# Altium PCB BetaBake_REV_1.0.PcbDoc (part 5 of 8)
Units mil, origin at the board's own origin, x right, y up, seen from the top; angles counter-clockwise.
Board outline 6000 x 4000 mil, 8 copper layers (USB 2.0 (90 Diff) DDR3 Data (50-100), GND (Top Layer high-speed return paths), DDR3 Fly-by Routing (Address, Command, Control), QSPI Flash (Clk, IO), Int4 PWR, Int5 GND (Shielding between L4 and L6), Int6 eMMC High-Speed Data Lines (8-bit bus), SDIO/peripherals, Int7 GND, Escapes, non-critical tracks, decoupling capacitor vias), stack 60.424 mil thick; 426 components, 331 nets, 1941 pads, 428 vias.
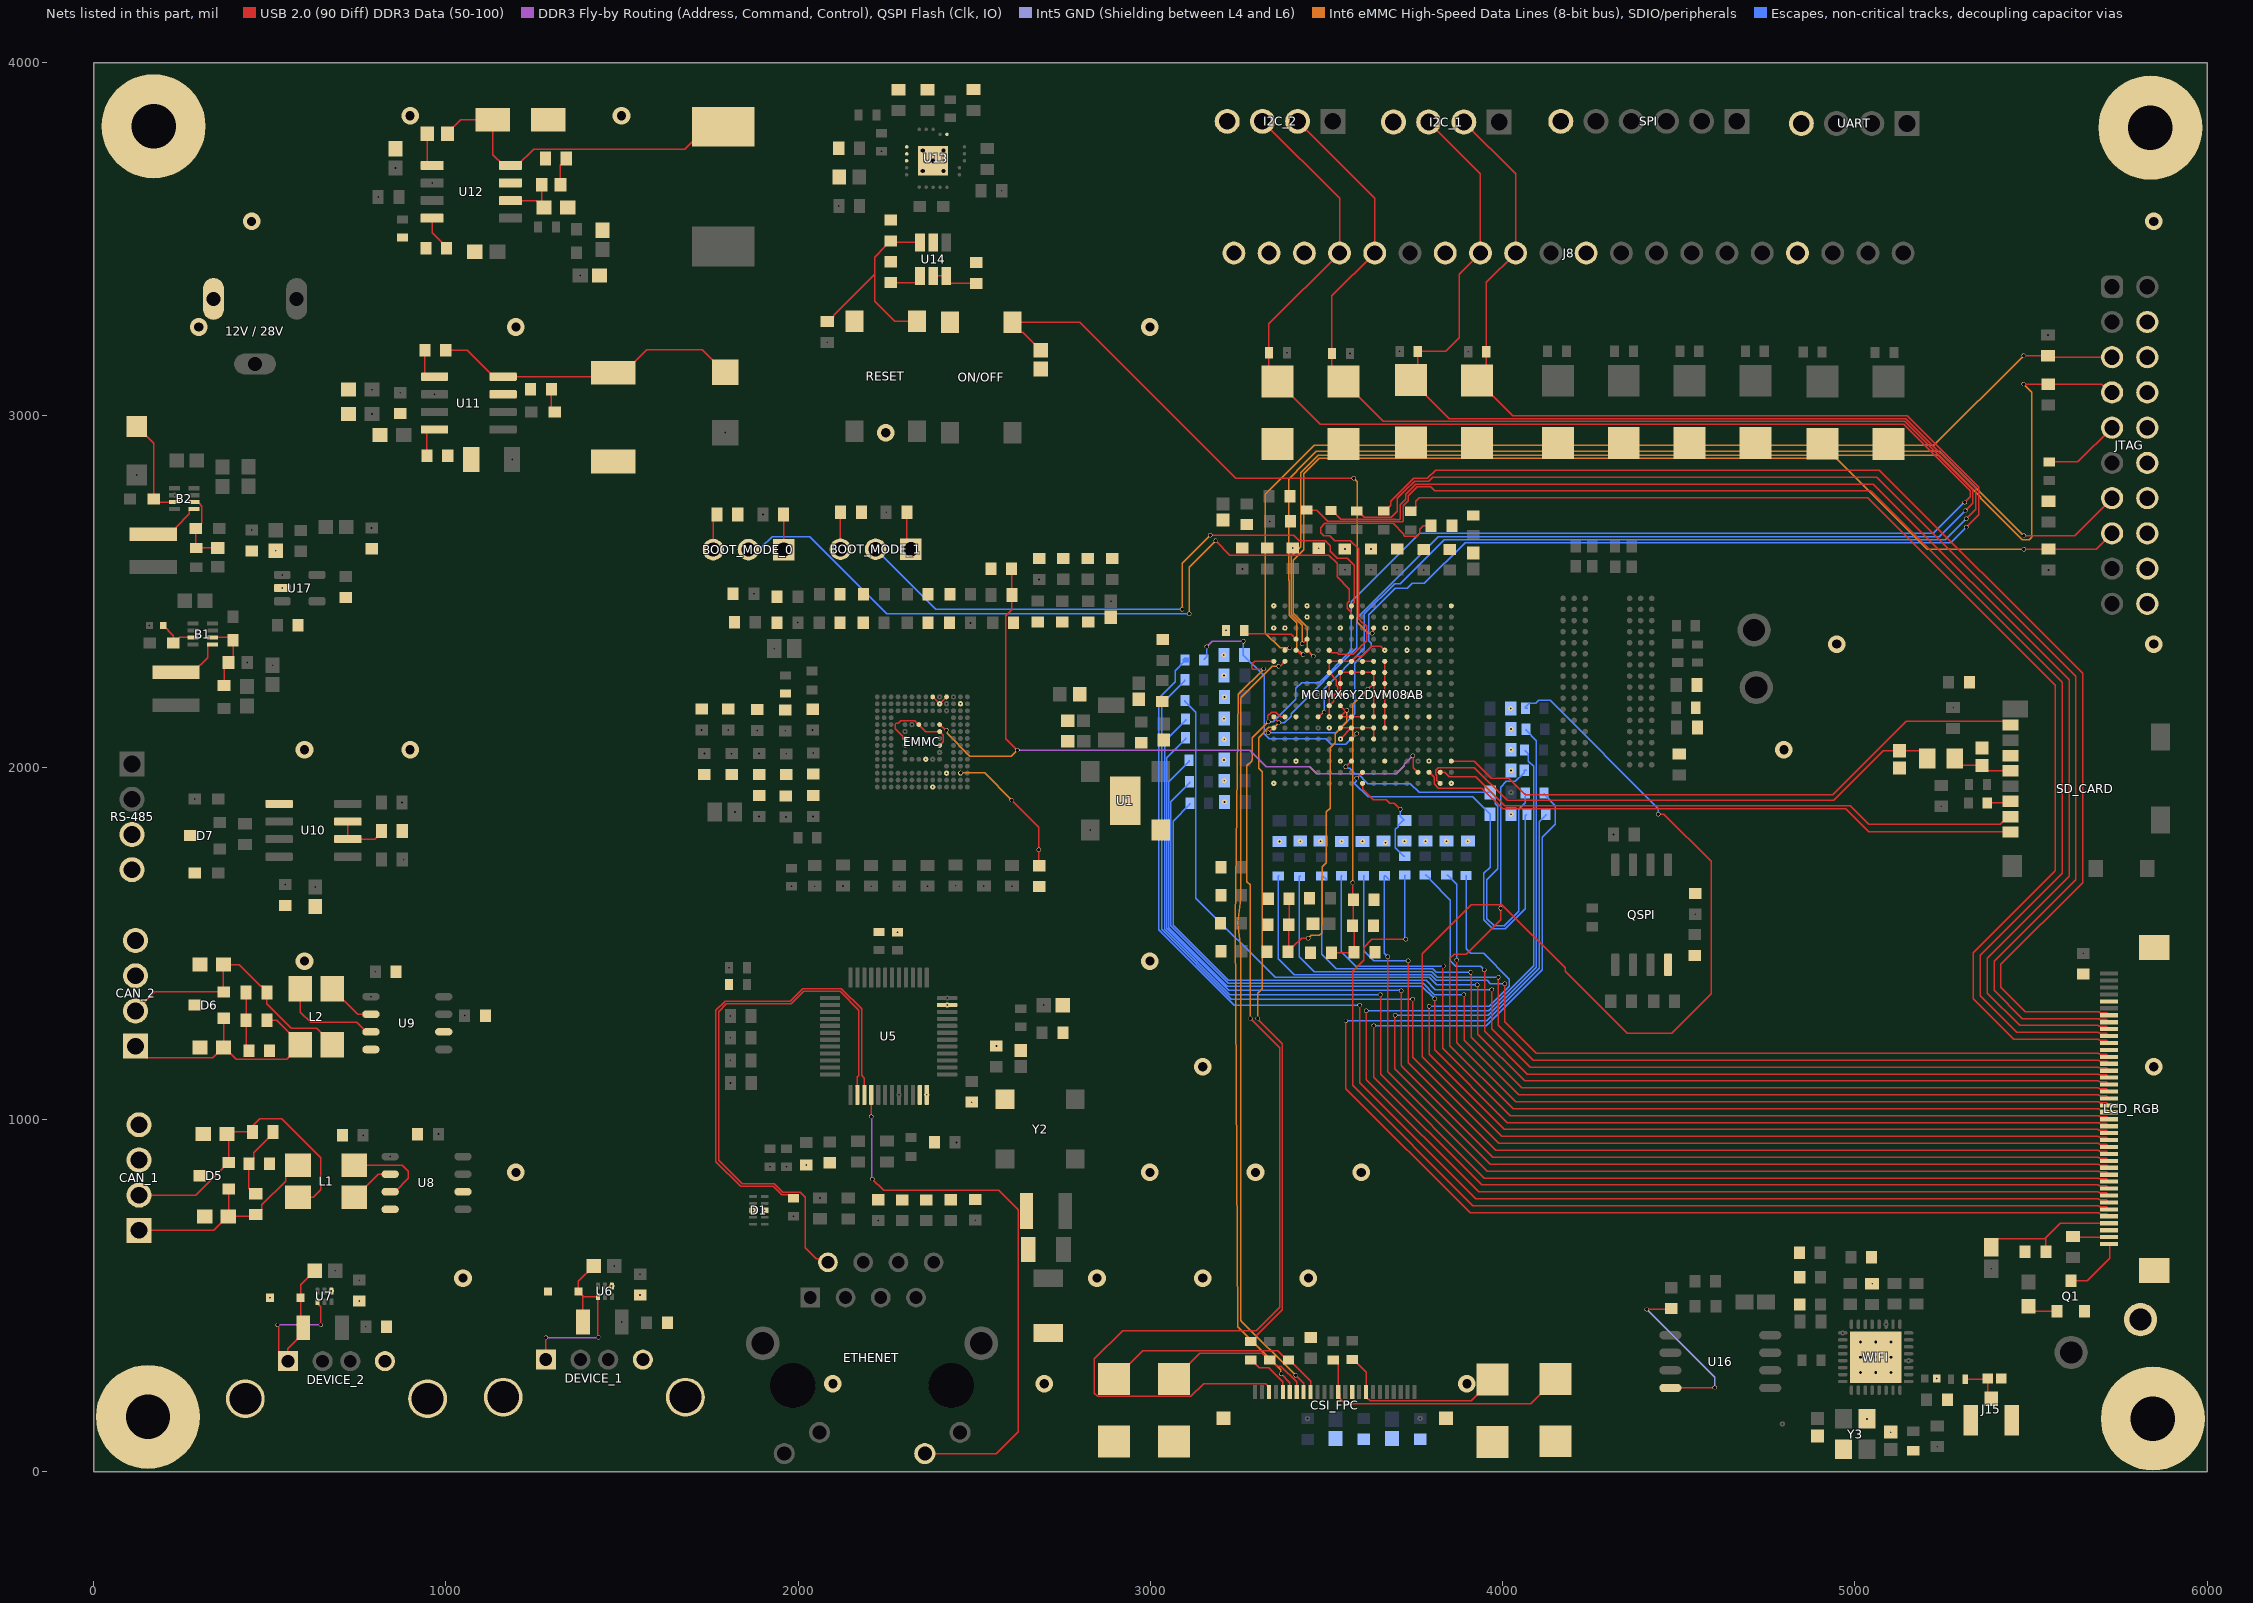
[diagram p10: the nets of this part, all layers, seen from the top]

## Via types
v1: diameter 12, hole 10, USB 2.0 (90 Diff) DDR3 Data (50-100) to Escapes, non-critical tracks, decoupling capacitor vias, 382 vias
v2: diameter 50, hole 26, USB 2.0 (90 Diff) DDR3 Data (50-100) to Escapes, non-critical tracks, decoupling capacitor vias, 28 vias
v3: diameter 19.68, hole 7.87, USB 2.0 (90 Diff) DDR3 Data (50-100) to Escapes, non-critical tracks, decoupling capacitor vias, 9 vias
v4: diameter 23.62, hole 11.81, USB 2.0 (90 Diff) DDR3 Data (50-100) to Escapes, non-critical tracks, decoupling capacitor vias, 5 vias
v5: diameter 7.87, hole 7.87, USB 2.0 (90 Diff) DDR3 Data (50-100) to Escapes, non-critical tracks, decoupling capacitor vias, 4 vias

## Nets (pads, with @x,y where several pads share a name; then routed paths per layer and width w, separated by ;. In a path a pad name is that pad's centre, name@x,y a point inside that pad or via, vN(x,y) a via of type N, cw(c..) or ccw(c..) an arc to the next point about the centre after c; other vN are vias at no path point) (continued)
GND: "12V / 28V.2" C1.2 C2.2 C3.2 C4.2 C5.2 C6.2 C7.2 C8.2 C9.2 C10.2 C11.2 C12.2 C13.2 C14.2 C15.2 C16.2 C17.2 C18.2 C19.2 C20.2 C21.2 C22.2 C23.2 C24.2 C25.2 C26.2 C27.2 C28.2 C29.2 C30.1 C31.1 C32.2 C33.2 C34.2 C35.2 C36.1 C37.2 C38.2 C39.2 C40.2 C41.2 C42.2 C43.2 C44.1 C45.2 C50.1 C51.1 C52.1 C53.2 C54.2 C55.2 C56.2 C57.2 C58.2 C59.2 C60.2 C61.1 C62.1 C63.2 C64.2 C65.2 C66.2 C67.2 C68.2 C69.2 C70.1 C71.1 C72.1 C73.2 C74.2 C75.2 C76.2 C77.2 C78.2 C79.2 C80.1 C81.2 C82.2 C83.2 C87.2 C88.1 C90.1 C91.1 C92.1 C93.1 C94.2 C95.2 C96.2 C97.2 C98.1 C99.1 C100.1 C101.2 C102.1 C103.2 C104.1 C105.2 C106.1 C107.2 C108.1 C109.1 C110.2 C111.1 C112.2 C113.1 C114.1 C115.1 C116.2 C117.1 C120.2 C121.1 C124.1 C128.1 C130.1 C131.1 C134.2 C135.2 C136.2 C139.2 C140.2 C142.2 C144.2 C145.1 C146.2 C147.1 C149.2 C150.1 C152.1 C153.1 C154.1 C155.1 C159.1 C162.1 C163.1 C164.1 C165.1 C166.1 C167.1 C168.1 C169.1 C170.1 C245.2 C356.1 CAN_1.3 CAN_1.4 CAN_2.3 CAN_2.4 CSI_FPC.15 CSI_FPC.MP1 CSI_FPC.MP2 D1.3 D1.8 D2.1 D3.1 D4.1 D5.3 D6.3 D7.3 D8.1 D9.1 D10.1 D11.1 D12.1 D13.1 D14.1 D15.1 D16.1 D17.1 D18.2 D20.2 D22.1 D23.1 D24.1 D25.1 DEVICE_1.4 DEVICE_1.5 DEVICE_1.6 DEVICE_2.4 DEVICE_2.5 DEVICE_2.6 EMMC.A6 EMMC.C4 EMMC.E7 EMMC.G5 EMMC.H10 EMMC.J5 EMMC.K8 EMMC.N2 EMMC.N5 EMMC.P4 EMMC.P6 GND.1 GND_1.1 I2C_1.4 I2C_2.4 J8.4 J8.10 J8.14 J8.18 J8.19 J8.20 J15.G1 J15.G2 JTAG.4 JTAG.6 JTAG.8 JTAG.10 JTAG.12 JTAG.14 JTAG.16 JTAG.18 JTAG.20 LCD_RGB.3 LCD_RGB.29 LCD_RGB.36 LCD_RGB.41 LCD_RGB.42 MCIMX6Y2DVM08AB.A1 MCIMX6Y2DVM08AB.A17 MCIMX6Y2DVM08AB.C3 MCIMX6Y2DVM08AB.C7 MCIMX6Y2DVM08AB.C11 MCIMX6Y2DVM08AB.C15 MCIMX6Y2DVM08AB.E8 MCIMX6Y2DVM08AB.E11 MCIMX6Y2DVM08AB.F6 MCIMX6Y2DVM08AB.F7 MCIMX6Y2DVM08AB.F8 MCIMX6Y2DVM08AB.F9 MCIMX6Y2DVM08AB.F10 MCIMX6Y2DVM08AB.F11 MCIMX6Y2DVM08AB.F12 MCIMX6Y2DVM08AB.G3 MCIMX6Y2DVM08AB.G5 MCIMX6Y2DVM08AB.G7 MCIMX6Y2DVM08AB.G12 MCIMX6Y2DVM08AB.G15 MCIMX6Y2DVM08AB.H7 MCIMX6Y2DVM08AB.H12 MCIMX6Y2DVM08AB.J5 MCIMX6Y2DVM08AB.J7 MCIMX6Y2DVM08AB.J12 MCIMX6Y2DVM08AB.K7 MCIMX6Y2DVM08AB.K12 MCIMX6Y2DVM08AB.L3 MCIMX6Y2DVM08AB.L7 MCIMX6Y2DVM08AB.L12 MCIMX6Y2DVM08AB.M7 MCIMX6Y2DVM08AB.M8 MCIMX6Y2DVM08AB.M9 MCIMX6Y2DVM08AB.M10 MCIMX6Y2DVM08AB.M11 MCIMX6Y2DVM08AB.M12 MCIMX6Y2DVM08AB.N3 MCIMX6Y2DVM08AB.N5 MCIMX6Y2DVM08AB.N7 MCIMX6Y2DVM08AB.R3 MCIMX6Y2DVM08AB.R5 MCIMX6Y2DVM08AB.R7 MCIMX6Y2DVM08AB.R11 MCIMX6Y2DVM08AB.R16 MCIMX6Y2DVM08AB.R17 MCIMX6Y2DVM08AB.T14 MCIMX6Y2DVM08AB.U1 MCIMX6Y2DVM08AB.U14 MCIMX6Y2DVM08AB.U17 ON/OFF.3 pad.329 pad.330 pad.331 pad.332 pad.333 pad.334 pad.335 pad.336 pad.337 pad.338 pad.339 pad.340 pad.341 pad.342 pad.343 pad.347 pad.348 pad.349 pad.351 pad.352 pad.353 pad.354 pad.355 pad.356 pad.358 pad.359 pad.360 pad.361 pad.362 pad.363 pad.364 pad.365 pad.366 pad.367 pad.368 pad.372 pad.373 pad.374 pad.377 pad.378 pad.379 pad.380 pad.381 pad.382 pad.383 pad.384 pad.385 pad.386 pad.387 pad.388 pad.389 pad.390 pad.391 pad.392 pad.393 pad.394 pad.395 pad.396 pad.397 pad.398 pad.399 pad.400 pad.401 pad.402 pad.403 pad.404 pad.405 pad.406 pad.407 pad.408 pad.409 pad.410 pad.411 pad.412 pad.413 pad.414 Q1.2 QSPI.4 R6.1 R7.1 R8.1 R9.1 R10.1 R11.1 R12.1 R13.1 R14.1 R15.1 R16.1 R17.1 R18.1 R19.1 R20.1 R21.1 R22.1 R23.1 R24.1 R25.1 R26.1 R27.1 R28.1 R29.1 R40.2 R43.2 R44.2 R45.1 R46.1 R65.1 R73.1 R76.2 R78.1 R81.1 R86.2 R96.1 R98.2 R135.2 R142.2 R151.2 R152.1 R154.1 R164.1 R165.1 R166.1 R167.1 R169.1 R184.2 R185.2 RESET.3 RS-485.3 RS-485.4 SD_CARD.6 SPI.6 U1.2 U1.5 U5.35 U5.36 U5.47 U6.4 U7.4 U8.2 U8.8 U9.2 U9.8 U10.5 U11.7 U12.7 U13.6 U13.11 U13.12 U13.13 U13.21 U14.2 U16.4 U17.2 UART.4 WIFI.33 Y2.2 Y3.2 Y3.4 | length 1642.4
  USB 2.0 (90 Diff) DDR3 Data (50-100) w4: EMMC.H10@2303.18,2081.96 2275,2110.14 2275,2122.66 2277.34,2125 2283.41,2125 2291.41,2133 2330.88,2133 EMMC.K8@2342.55,2121.33 2362.23,2101.65 EMMC.J5@2401.6,2101.65 2412.49,2090.76 2412.49,2073.17 EMMC.G5@2401.6,2062.28 ; EMMC.P6@2381.92,2200.08 EMMC.N5@2401.6,2180.39 EMMC.P4@2421.29,2200.08 ; MCIMX6Y2DVM08AB.G12@3507.76,2143.5 MCIMX6Y2DVM08AB.H12@3507.76,2174.99 ; MCIMX6Y2DVM08AB.K12@3507.76,2237.98 MCIMX6Y2DVM08AB.J12@3507.76,2206.49 MCIMX6Y2DVM08AB.H12@3507.76,2174.99 ; MCIMX6Y2DVM08AB.F11@3539.25,2112 MCIMX6Y2DVM08AB.F10@3570.75,2112 ; pad.349@3539.83,2080.5 3539.83,2080.79 3570.75,2111.71 MCIMX6Y2DVM08AB.F10@3570.75,2112 ; MCIMX6Y2DVM08AB.E8@3633.74,2080.5 MCIMX6Y2DVM08AB.F8@3633.74,2112 MCIMX6Y2DVM08AB.F9@3602.24,2112 MCIMX6Y2DVM08AB.F10@3570.75,2112 ; MCIMX6Y2DVM08AB.M8@3633.74,2300.98 MCIMX6Y2DVM08AB.M9@3602.24,2300.98 MCIMX6Y2DVM08AB.M10@3570.75,2300.98 ; MCIMX6Y2DVM08AB.F7@3665.24,2112 MCIMX6Y2DVM08AB.G7@3665.24,2143.5 MCIMX6Y2DVM08AB.H7@3665.24,2174.99 MCIMX6Y2DVM08AB.J7@3665.24,2206.49 MCIMX6Y2DVM08AB.K7@3665.24,2237.98 MCIMX6Y2DVM08AB.L7@3665.24,2269.48 MCIMX6Y2DVM08AB.M7@3665.24,2300.98 ; MCIMX6Y2DVM08AB.N7@3665.24,2332.47 3653.95,2343.76 3629.07,2343.76 3615.1,2329.79 3615.1,2329.37 3601.13,2315.4 3585.17,2315.4 MCIMX6Y2DVM08AB.M10@3570.75,2300.98 ; v1(4409,461) 4476.53,461 C167.1@4479,463.47 ; U16.4@4476.27,238 4476.77,238.5 4601.5,238.5 v1(4602,239) ; MCIMX6Y2DVM08AB.H12@3507.76,2174.99 3520.89,2188.12 3520.89,2204.08 3532,2215.19 3532,2228.78 3527.97,2232.82 3527.97,2249.27 MCIMX6Y2DVM08AB.L12@3507.76,2269.48 MCIMX6Y2DVM08AB.M12@3507.76,2300.98 MCIMX6Y2DVM08AB.M11@3539.25,2300.98 MCIMX6Y2DVM08AB.M10@3570.75,2300.98
  Int5 GND (Shielding between L4 and L6) w4: v1(4409,461) 4602,268 v1(4602,239)
  other v2: 2098.43,250 2698.43,250 3898.43,250 1048.43,550 2848.43,550 3148.43,550 3448.43,550 1198.43,850 2998.43,850 3298.43,850 3598.43,850 3148.43,1150 5848.43,1150 598.43,1450 2998.43,1450 598.43,2050 898.43,2050 4798.43,2050 4948.43,2350 5848.43,2350 2248.43,2950 298.43,3250 1198.43,3250 2998.43,3250 448.43,3550 5848.43,3550 898.43,3850 1498.43,3850
  other v3: 5015.69,282 5059,282 5102.31,282 5015.69,325.31 5059,325.31 5102.31,325.31 5015.69,368.61 5059,368.61 5102.31,368.61
  other v4: 2353.55,3692.59 2412.61,3692.59 2383.08,3722.12 2353.55,3751.65 2412.61,3751.65
I2C1_SCL: D13.2 I2C_1.2 J8.12 MCIMX6Y2DVM08AB.F17 R2.1 | length 4909
  USB 2.0 (90 Diff) DDR3 Data (50-100) w4: v1(3334.51,2098) 3335.39,2098 3349.39,2112 MCIMX6Y2DVM08AB.F17@3350.28,2112 ; I2C_1.2@3889.9,3832.06 4037,3684.95 J8.12@4037,3460 3953.59,3376.59 R2.1@3953.59,3180 3953.59,3124.62 D13.2@3927.47,3098.5 4027.98,2998 5148.39,2998 5351,2795.39 5351,2717 v1(5316,2682)
  Escapes, non-critical tracks, decoupling capacitor vias w4: v1(3334.51,2098) 3526.2,2098 3580,2151.8 3580,2296 3627,2343 3627,2352.14 3620,2359.14 3620,2433.14 3694.71,2507.85 3729.71,2507.85 3743.85,2522 3777.85,2522 3893.34,2637.49 5271.49,2637.49 v1(5316,2682)
I2C1_SDA: D12.2 I2C_1.3 J8.13 MCIMX6Y2DVM08AB.G13 R1.1 | length 4919
  USB 2.0 (90 Diff) DDR3 Data (50-100) w4: MCIMX6Y2DVM08AB.G13@3476.26,2143.5 3477.88,2143.5 3491.38,2157 v1(3493,2157) ; I2C_1.3@3789.9,3832.06 3937,3684.95 J8.13@3937,3460 3877,3400 3877,3220 3838,3181 R1.1@3758.59,3181 3758.59,3118.61 D12.2@3739.48,3099.5 3848.98,2990 5145.08,2990 5343,2792.08 5343,2733 v1(5316,2706)
  Escapes, non-critical tracks, decoupling capacitor vias w4: v1(3493,2157) 3493,2223.5 3607,2337.5 3607,2435.41 3693.04,2521.45 3709.7,2521.45 3834.23,2645.99 5255.99,2645.99 v1(5316,2706)
I2C2_SCL: D9.2 I2C_2.2 J8.16 MCIMX6Y2DVM08AB.G17 R3.1 R174.2 | length 7017.6
  USB 2.0 (90 Diff) DDR3 Data (50-100) w4: R174.2@3285,370.28 3288.02,370.28 3298.99,381.25 3298.99,384.27 3374.54,459.82 3374.54,1216 3305,1285.54 v1(3305,1287) ; MCIMX6Y2DVM08AB.G17@3350.28,2143.5 3350.28,2141.28 3350,2141 3351.89,2141 3365,2127.89 v1(3365,2127) ; I2C_2.2@3418,3834 3637,3615 J8.16@3637,3460 3515.41,3338.41 R3.1@3515.41,3175 3515.41,3127.71 D9.2@3547.61,3095.5 3661.12,2982 5141.77,2982 5335,2788.77 5335,2750 v1(5314,2729)
  Int6 eMMC High-Speed Data Lines (8-bit bus), SDIO/peripherals w4: v1(3305,1287) 3305,1359 3317,1371 3317,1987.29 3307,1997.29 3307,2084.63 3336.18,2113.81 3351.81,2113.81 v1(3365,2127)
  Escapes, non-critical tracks, decoupling capacitor vias w4: v1(3365,2127) 3380.55,2127 3399.15,2145.6 3399.15,2152.29 3584.85,2337.99 ccw(c3582,2340.8) 3586,2340.8 3586,2422.9 3817.09,2653.99 5238.99,2653.99 v1(5314,2729)
I2C2_SDA: CSI_FPC.3 D8.2 I2C_2.3 J8.17 MCIMX6Y2DVM08AB.G16 R4.1 | length 8408
  USB 2.0 (90 Diff) DDR3 Data (50-100) w4: v1(3284,1287) 3366.54,1204.46 3366.54,467.54 3300,401 2921,401 2841,321 2841,222.96 2850.07,213.89 3113.93,213.89 3150.73,250.69 3326.72,250.69 3336.63,240.78 CSI_FPC.3@3336.63,227 ; I2C_2.3@3318,3834 3537,3615 J8.17@3537,3460 3336.41,3259.41 R4.1@3336.41,3177 3336.41,3119.72 D8.2@3360.62,3095.5 3482.13,2974 5138.45,2974 5327,2785.45 5327,2768 5312,2753 v1(5312,2752) ; v1(3334.51,2129) 3333.78,2129.73 3333.78,2145.79 3344.77,2156.78 3355.78,2156.78 3368.49,2144.07 3380.93,2144.07 MCIMX6Y2DVM08AB.G16@3381.77,2143.23
  Int6 eMMC High-Speed Data Lines (8-bit bus), SDIO/peripherals w4: v1(3284,1287) 3284,1666 3274.13,1675.87 3274.13,2004.97 3287,2017.84 3287,2019.46 3289,2021.46 3289,2083.49 v1(3334.51,2129)
  Escapes, non-critical tracks, decoupling capacitor vias w4: v1(3334.51,2129) 3349,2129 3407.43,2187.43 3407.43,2187.57 3413,2193.14 3413,2223.86 3429.64,2240.5 3478.77,2240.5 3570.75,2332.47 3570.75,2470.39 3764.35,2664 5223.03,2664 5311.03,2752 v1(5312,2752)
LED_ACT/COL: ETHENET.2 U5.26 | length 1649.6
  USB 2.0 (90 Diff) DDR3 Data (50-100) w4: ETHENET.2@2084.5,594.74 2074.55,604.69 2051.31,604.69 2020,636 2020,779.63 2005.23,794.4 1955.96,794.4 1932.18,818.18 1840.62,818.18 1773.81,884.99 1774.15,885.33 1774.15,1306.84 1795.57,1328.26 1980.55,1328.26 2016.29,1364 2119,1364 2172,1311 2172,1125 2168.15,1121.15 U5.26@2168.15,1070.32 U5.26@2164.24,1096.87
LED_LINK: ETHENET.11 U5.28 | length 1612.5
  USB 2.0 (90 Diff) DDR3 Data (50-100) w4: v1(2207.52,1008.52) U5.28@2207.52,1070.32 ; v1(2210,831) 2240.83,800.17 ccw(c2243.66,803) 2243.66,799 2570,799 2625,744 2625,114 2562.74,51.74 ETHENET.11@2359.5,51.74
  DDR3 Fly-by Routing (Address, Command, Control), QSPI Flash (Clk, IO) w4: v1(2207.52,1008.52) 2208.76,1007.28 2208.76,832.24 v1(2210,831)
LED_SPEED: R71.1 U5.27 | length 1403.9
  USB 2.0 (90 Diff) DDR3 Data (50-100) w4: R71.1@1987,776.59 1977.19,786.4 1952.65,786.4 1928.53,810.53 1836.47,810.53 1766.15,880.85 1766.15,1310.15 1792.42,1336.42 1977.4,1336.42 2012.98,1372 2122.31,1372 2180,1314.31 2180,1125.83 2187.83,1118 U5.27@2187.83,1070.32
MODE_RS485: R96.2 U10.2 U10.3 | length 157.4
  USB 2.0 (90 Diff) DDR3 Data (50-100) w4: U10.3@721.38,1846.14 U10.2@721.38,1796.14 798.08,1796.14 817,1815.06 R96.2@817,1819
NetB1_3: 1V4.1 B1.3 R146.1 | length 123.9
  USB 2.0 (90 Diff) DDR3 Data (50-100) w4: 1V4.1@197.37,2403 226.46,2373.91 R146.1@226.46,2353 228.43,2353 244.12,2368.69 B1.3@281.86,2368.69
NetB1_5: B1.5 L3.1 | length 155.7
  USB 2.0 (90 Diff) DDR3 Data (50-100) w4: L3.1@234,2269.65 281.64,2269.65 323.23,2311.24 323.23,2345.09 327.13,2349 B1.5@336.98,2349
NetB1_6: B1.6 C125.1 R144.1 R145.2 | length 201.7
  USB 2.0 (90 Diff) DDR3 Data (50-100) w4: B1.6@336.98,2368.69 388.31,2368.69 R145.2@396,2361 396,2311.15 C125.1@382.85,2298 370,2285.15 R144.1@370,2232.28
NetB2_3: 1V35.1 B2.3 R155.1 | length 289.4
  USB 2.0 (90 Diff) DDR3 Data (50-100) w4: 1V35.1@122,2967.9 169.93,2919.97 R155.1@169.93,2762 178.93,2753 B2.3@229.86,2753
NetB2_5: B2.5 L6.1 | length 153
  USB 2.0 (90 Diff) DDR3 Data (50-100) w4: L6.1@169,2662 216.64,2662 233.93,2679.29 233.93,2682.27 271.23,2719.57 271.23,2729.41 275.13,2733.31 B2.5@284.98,2733.31
NetB2_6: B2.6 C137.1 R149.1 R153.2 | length 215
  USB 2.0 (90 Diff) DDR3 Data (50-100) w4: B2.6@284.98,2753 288.88,2749.09 299.34,2749.09 306.73,2741.71 306.73,2717.46 306.73,2694.88 cw(c302.73,2694.88) 305.55,2692.05 291.5,2678 R153.2@289.54,2678 289.54,2624.46 R149.1@291,2623 351.57,2623 C137.1@352,2622.57
NetC18_1: C18.1 C19.1 C20.1 C21.1 MCIMX6Y2DVM08AB.G8 MCIMX6Y2DVM08AB.H8 MCIMX6Y2DVM08AB.J8 MCIMX6Y2DVM08AB.J11 MCIMX6Y2DVM08AB.K8 MCIMX6Y2DVM08AB.K11 MCIMX6Y2DVM08AB.L8 MCIMX6Y2DVM08AB.L9 MCIMX6Y2DVM08AB.L10 MCIMX6Y2DVM08AB.L11 | length 1144.2
  USB 2.0 (90 Diff) DDR3 Data (50-100) w4: C20.1@3513.59,1473.87 3577.06,1473.87 C18.1@3578.06,1474.87 3578.06,1545.22 ccw(c3574.06,1545.22) 3576.89,1548.05 C21.1@3574.06,1550.87 3576.06,1552.87 C19.1@3576.06,1623.87 3574,1625.94 v1(3574,1673) ; MCIMX6Y2DVM08AB.J11@3539.25,2206.49 MCIMX6Y2DVM08AB.K11@3539.25,2237.98 MCIMX6Y2DVM08AB.L11@3539.25,2269.48 MCIMX6Y2DVM08AB.L10@3570.75,2269.48 MCIMX6Y2DVM08AB.L9@3602.24,2269.48 MCIMX6Y2DVM08AB.L8@3633.74,2269.48 MCIMX6Y2DVM08AB.K8@3633.74,2237.98 ; v1(3617,2222) 3617.38,2222 3633.36,2237.98 MCIMX6Y2DVM08AB.K8@3633.74,2237.98 ; MCIMX6Y2DVM08AB.H8@3629.5,2174.06 3632.96,2174.82 MCIMX6Y2DVM08AB.H8@3633.74,2174.99 ; MCIMX6Y2DVM08AB.G8@3633.74,2143.5 MCIMX6Y2DVM08AB.H8@3633.74,2174.99 ; MCIMX6Y2DVM08AB.H8@3633.74,2174.99 MCIMX6Y2DVM08AB.J8@3633.74,2206.49 MCIMX6Y2DVM08AB.K8@3633.74,2237.98
  Int6 eMMC High-Speed Data Lines (8-bit bus), SDIO/peripherals w4: v1(3574,1673) 3574,2179 v1(3617,2222)
NetC24_1: C24.1 C25.1 C26.1 MCIMX6Y2DVM08AB.G9 MCIMX6Y2DVM08AB.G10 MCIMX6Y2DVM08AB.G11 MCIMX6Y2DVM08AB.H11 | length 1044
  USB 2.0 (90 Diff) DDR3 Data (50-100) w4: C24.1@3390.12,1475.87 3390.12,1477.84 C24.1@3392.84,1480.57 ; C26.1@3393.84,1627 3393.84,1554 C25.1@3392.84,1553 C24.1@3392.84,1480.57 ; v1(3448,1515) 3429.24,1515 3405.84,1491.59 3403.87,1491.59 C24.1@3392.84,1480.57 ; MCIMX6Y2DVM08AB.H11@3539.25,2174.99 3550.71,2163.53 ; v1(3558,2162) 3556.47,2163.53 3550.71,2163.53 ; MCIMX6Y2DVM08AB.G9@3602.24,2143.5 MCIMX6Y2DVM08AB.G10@3570.75,2143.5 MCIMX6Y2DVM08AB.G11@3539.25,2143.5 3555,2159.24 3550.71,2163.53
  Int6 eMMC High-Speed Data Lines (8-bit bus), SDIO/peripherals w4: v1(3448,1515) 3456,1523 3480,1523 3486.24,1529.24 3486.24,1553.24 3487.56,1554.55 3487.56,1717.98 3498.78,1729.21 3498.78,1873.25 3510,1884.47 3510,2055.9 3524.16,2070.07 3524.16,2095.96 3557.7,2129.5 v1(3558,2162)
NetC36_2: C36.2 MCIMX6Y2DVM08AB.N12 | length 893.1
  USB 2.0 (90 Diff) DDR3 Data (50-100) w4: MCIMX6Y2DVM08AB.N12@3507.76,2332.47 3514.69,2325.54 3530.22,2325.54 3534.58,2321.19 3575.42,2321.19 3590.96,2336.73 3590.96,2337.15 3602.03,2348.22 3602.45,2348.22 3613.53,2359.29 3613.53,2400.14 3602.45,2411.21 3602.03,2411.21 3590.96,2422.29 3590.96,2620.44 3567.74,2643.66 3522.71,2643.66 3509.37,2657 3492,2657 3483,2666 3483,2680.61 3495.36,2692.97 3591.77,2692.97 3592.36,2692.37 3688.77,2692.37 3719.38,2661.77 3719.38,2658.99 3721.72,2656.65 3757.01,2656.65 3764.64,2664.28 3764.64,2675.44 3775.2,2686 C36.2@3796.94,2686
NetC44_2: C44.2 MCIMX6Y2DVM08AB.R8 ON/OFF.1 | length 1753.2
  USB 2.0 (90 Diff) DDR3 Data (50-100) w4: C44.2@2689,3184 2638.02,3234.98 2632.17,3234.98 2608.58,3258.57 ON/OFF.1@2608.58,3263.5 2799.5,3263.5 3242,2821 v1(3577,2821) ; v1(3630,2380.84) 3630,2383.01 3631.72,2384.73 3631.72,2393.44 MCIMX6Y2DVM08AB.R8@3633.74,2395.46
  Int6 eMMC High-Speed Data Lines (8-bit bus), SDIO/peripherals w4: v1(3577,2821) 3587,2811 3587,2412 3618,2381 3629.84,2381 v1(3630,2380.84)
NetC51_2: C51.2 MCIMX6Y2DVM08AB.A2 R51.1 | length 1544.8
  USB 2.0 (90 Diff) DDR3 Data (50-100) w4: MCIMX6Y2DVM08AB.A2@3822.72,1954.52 3813.23,1964.01 3813.23,1976.72 3809.43,1980.51 3809.43,1991.52 3817.21,1999.3 3919.61,1999.3 4012.54,1906.37 4940.27,1906.37 5081.11,2047.21 C51.2@5127,2047.21 5183.64,2047.21 5203.29,2027.56 R51.1@5203.29,2027.35
NetC52_2: C52.2 R51.2 SD_CARD.5 | length 172.1
  USB 2.0 (90 Diff) DDR3 Data (50-100) w4: R51.2@5284,2025 5303.61,2005.39 C52.2@5361,2005.39 5376.41,1989.98 SD_CARD.5@5441.62,1989.98
NetC53_1: C53.1 EMMC.K5 MCIMX6Y2DVM08AB.B4 R53.2 | length 2031.8
  USB 2.0 (90 Diff) DDR3 Data (50-100) w4: EMMC.K5@2401.6,2121.33 2415.41,2107.53 2419.47,2107.53 v1(2421,2106) ; C53.1@2606,2564 2606,2490 R53.2@2607,2489 2607,2447.42 2589.78,2430.2 2589.78,2081.22 v1(2622,2049) ; v1(3744.53,2032.72) 3746.06,2031.19 3746.06,2025.54 3746.63,2024.97 3746.63,1999.11 MCIMX6Y2DVM08AB.B4@3759.72,1986.02
  DDR3 Fly-by Routing (Address, Command, Control), QSPI Flash (Clk, IO) w4: v1(2622,2049) 3281.55,2049 3329.07,2001.48 3452.98,2001.48 3472.46,1982 3657.28,1982 3657.55,1982.27 3698.27,1982.27 3720.63,2004.63 3720.63,2008.83 v1(3744.53,2032.72)
  Int6 eMMC High-Speed Data Lines (8-bit bus), SDIO/peripherals w4: v1(2421,2106) 2422.53,2104.47 2422.53,2096.47 2487,2032 2605,2032 v1(2622,2049)
NetC60_1: C60.1 EMMC.C2 | length 396.7
  USB 2.0 (90 Diff) DDR3 Data (50-100) w4: EMMC.C2@2460.66,1983.54 2461,1983.88 v1(2461,1984) ; v1(2606,1907) 2683,1830 v1(2683,1766) 2683,1722.53 C60.1@2685,1720.53
  Int6 eMMC High-Speed Data Lines (8-bit bus), SDIO/peripherals w4: v1(2461,1984) 2529,1984 v1(2606,1907)
NetC104_2: C104.2 CAN_1.1 D5.1 L1.2 R91.2 | length 621.7
  USB 2.0 (90 Diff) DDR3 Data (50-100) w4: CAN_1.1@128.74,685.35 340.31,685.35 384.02,729.06 D5.1@384.02,803.27 ; C104.2@381.93,725 454.53,725 R91.2@460,730.47 463.94,730.47 477.69,744.22 477.69,757.7 545.58,825.6 545.58,839.09 577.05,870.55 L1.2@580,870.55
NetC105_1: C105.1 R91.1 R92.2 | length 214.5
  USB 2.0 (90 Diff) DDR3 Data (50-100) w4: R91.1@460,789.53 456.06,789.53 440.47,805.12 C105.1@440.47,875 454.22,888.75 454.22,905.76 509.53,961.06 R92.2@509.53,965
NetC107_1: C107.1 CAN_1.2 D5.2 L1.3 R92.1 | length 879.5
  USB 2.0 (90 Diff) DDR3 Data (50-100) w4: CAN_1.2@128.74,785.35 289.33,785.35 382.05,878.07 D5.2@384.02,878.07 384.02,952.87 C107.1@378.11,958.78 384.33,965 R92.1@450.47,965 450.47,981.47 471,1002 534,1002 644,892 644,801 623,780 L1.3@580,780
NetC109_2: C109.2 CAN_2.1 D6.1 L2.2 R93.2 | length 734.5
  USB 2.0 (90 Diff) DDR3 Data (50-100) w4: CAN_2.1@118.74,1208.27 151.01,1176 337.5,1176 366.5,1205 C109.2@368.46,1205 ; D6.1@369.37,1287.6 369.37,1205.91 C109.2@368.46,1205 ; R93.2@491.81,1282.01 519.94,1282.01 586.72,1215.23 L2.2@586.72,1212.28 586.72,1209.32 548.68,1171.28 404.15,1171.28 370.43,1205 C109.2@368.46,1205
NetC110_1: C110.1 R93.1 R94.2 | length 168.9
  USB 2.0 (90 Diff) DDR3 Data (50-100) w4: R94.2@432.76,1360.75 R93.1@432.76,1282.01 432.76,1202.72 C110.1@440.47,1195
NetC112_1: C112.1 CAN_2.2 D6.2 L2.3 R94.1 | length 775.5
  USB 2.0 (90 Diff) DDR3 Data (50-100) w4: CAN_2.2@118.74,1308.27 173.78,1363.31 368.46,1363.31 C112.1@368.46,1440 412.56,1440 474.13,1378.43 478.06,1378.43 491.81,1364.68 R94.1@491.81,1360.75 491.81,1328.19 561,1259 633.5,1259 677.28,1215.23 L2.3@677.28,1212.28
NetC117_2: C117.2 FB4.1 LCD_RGB.4 | length 406.1
  USB 2.0 (90 Diff) DDR3 Data (50-100) w4: FB4.1@5387,637.55 5387,642.43 5405.83,661.26 5538.26,661.26 5542,665 ; C117.2@5542,625 5542,665 ; LCD_RGB.4@5722,705.67 5582.67,705.67 5542,665
NetC120_1: C120.1 R143.1 | length 68.7
  USB 2.0 (90 Diff) DDR3 Data (50-100) w4: C120.1@1299.53,3074 1299.53,3017.94 R143.1@1308.46,3009
NetC121_2: C121.2 U11.4 | length 96.7
  USB 2.0 (90 Diff) DDR3 Data (50-100) w4: C121.2@942.01,2887.94 C121.2@945.94,2884 945.94,2949.26 955.68,2959 U11.4@967.76,2959
NetC126_1: C126.1 U11.1 | length 96.6
  USB 2.0 (90 Diff) DDR3 Data (50-100) w4: C126.1@940.47,3184 940.47,3118.74 950.21,3109 U11.1@967.76,3109
NetC126_2: C126.2 D18.1 L4.1 U11.8 | length 883.1
  USB 2.0 (90 Diff) DDR3 Data (50-100) w4: C126.2@999.53,3184 1060.28,3184 1135.28,3109 U11.8@1162.24,3109 1463.82,3109 D18.1@1475,3120.18 1504.13,3120.18 1569.95,3186 1727.65,3186 1792.02,3121.63 L4.1@1793,3121.63
NetC129_1: C129.1 U12.1 | length 97.5
  USB 2.0 (90 Diff) DDR3 Data (50-100) w4: C129.1@947,3799 947,3719.8 957.8,3709 U12.1@960.78,3709
NetC129_2: C129.2 D20.1 L5.1 U12.8 | length 968.7
  USB 2.0 (90 Diff) DDR3 Data (50-100) w4: C129.2@1004.09,3799 1004.09,3800.97 1042.12,3839 D20.1@1133.26,3839 1133.26,3739.28 1163.54,3709 U12.8@1183.22,3709 1202.91,3709 1248.59,3754.69 1678.24,3754.69 1767.32,3843.76 L5.1@1787,3843.76
NetC139_1: C139.1 U12.4 | length 102.1
  USB 2.0 (90 Diff) DDR3 Data (50-100) w4: U12.4@960.78,3559 960.78,3517.19 1002,3475.97 C139.1@1002,3474
NetC140_1: C140.1 C141.2 U12.6 | length 162.1
  USB 2.0 (90 Diff) DDR3 Data (50-100) w4: U12.6@1183.22,3609 1256.57,3609 C140.1@1272,3593.57 ; C141.2@1272,3654 C140.1@1272,3593.57 ; C140.1@1276.57,3589 C140.1@1272,3593.57
NetC141_1: C141.1 R154.2 | length 81.8
  USB 2.0 (90 Diff) DDR3 Data (50-100) w4: C141.1@1325.15,3654 1325.15,3708.69 1341.53,3725.06 R154.2@1341.53,3729
NetC145_2: C145.2 U14.4 | length 95.1
  USB 2.0 (90 Diff) DDR3 Data (50-100) w4: C145.2@2263,3376.47 2334.17,3376.47 2345.94,3388.25 U14.4@2345.94,3395.57
NetC146_1: C146.1 R158.1 RESET.1 U14.3 | length 613.1
  USB 2.0 (90 Diff) DDR3 Data (50-100) w4: R158.1@2082.68,3265.75 2086.61,3265.75 2100.36,3279.5 2100.36,3283.43 2217,3400.07 ; RESET.1@2337.53,3266.55 2336.98,3266 2274,3266 2217,3323 2217,3400.07 ; U14.3@2345.94,3490.06 2267.42,3490.06 C146.1@2263,3494.47 2261.03,3494.47 2247.28,3480.72 2247.28,3478.76 2217,3448.47 2217,3400.07
NetC147_2: C147.2 U14.5 U14.6 | length 136.4
  USB 2.0 (90 Diff) DDR3 Data (50-100) w4: U14.5@2383.35,3395.57 U14.6@2420.75,3395.57 2420.75,3385.72 2432.53,3373.94 C147.2@2505,3373.94
NetC163_2: C163.2 J15.1 L7.2 | length 132.8
  USB 2.0 (90 Diff) DDR3 Data (50-100) w4.6: L7.2@5312.88,267.92 L7.2@5312.88,263 5374.71,263 C163.2@5376.71,265 5376.71,217.33 J15.1@5387,207.04 J15.1@5387,208.02
NetD3_2: D3.2 DEVICE_1.1 F1.1 R89.1 U6.1 | length 554.4
  USB 2.0 (90 Diff) DDR3 Data (50-100) w4: DEVICE_1.1@1283.53,318.62 1284,319.09 v1(1284,381) ; F1.1@1388.88,425 1388.88,499.43 ; R89.1@1420.06,584 1419.67,584 1376.31,540.64 D3.2@1376.31,512 1388.88,499.43 ; v1(1433.07,381.89) 1431.63,383.33 U6.1@1431.63,497.59 1390.72,497.59 1388.88,499.43
  DDR3 Fly-by Routing (Address, Command, Control), QSPI Flash (Clk, IO) w4: v1(1284,381) 1432.18,381 v1(1433.07,381.89)
NetD4_2: D4.2 DEVICE_2.1 F2.1 R90.1 U7.1 | length 598.8
  USB 2.0 (90 Diff) DDR3 Data (50-100) w4: v1(522,417) 522,414.84 524.74,412.1 524.74,340.72 DEVICE_2.1@551.28,314.17 551.28,349.77 594.76,393.25 F2.1@594.76,409 587.31,416.46 D4.2@587.31,494 587.31,530.64 627.67,571 R90.1@628.06,571 ; U7.1@635.32,478.32 636.1,478.32 639.22,475.2 639.22,474.41 645,468.63 v1(645,417)
  DDR3 Fly-by Routing (Address, Command, Control), QSPI Flash (Clk, IO) w4: v1(522,417) v1(645,417)
NetD22_2: CSI_FPC.17 D22.2 R178.1 | length 512.8
  USB 2.0 (90 Diff) DDR3 Data (50-100) w4: R178.1@3573.28,318.89 3576.3,318.89 3612.22,282.97 CSI_FPC.17@3612.22,227 3616.13,223.09 3616.13,208.7 3623.51,201.31 3910.31,201.31 D22.2@3971,262
NetD23_2: CSI_FPC.13 D23.2 R177.1 | length 766.4
  USB 2.0 (90 Diff) DDR3 Data (50-100) w4: R177.1@3519.28,317.53 3522.3,317.53 3533.48,306.35 CSI_FPC.13@3533.48,227 3537.39,223.09 3537.39,208.7 3552.77,193.31 4079.31,193.31 D23.2@4150,264
NetD24_2: CSI_FPC.9 D24.2 R176.1 | length 657.4
  USB 2.0 (90 Diff) DDR3 Data (50-100) w4: D24.2@2897,263.17 2977.8,343.97 3362.01,343.97 3388.98,317 R176.1@3392,317 3395.02,317 3454.74,257.28 CSI_FPC.9@3454.74,227
NetD25_2: CSI_FPC.7 D25.2 R175.1 | length 440.1
  USB 2.0 (90 Diff) DDR3 Data (50-100) w4: D25.2@3067,263.17 3139.8,335.97 3317.01,335.97 3335.98,317 R175.1@3339,317 3342.02,317 3358.92,300.1 3370.35,300.1 3415.37,255.07 CSI_FPC.7@3415.37,227
NetJ1_1: MCIMX6Y2DVM08AB.B3 SD_CARD.1 | length 1731.5
  USB 2.0 (90 Diff) DDR3 Data (50-100) w4: MCIMX6Y2DVM08AB.B3@3791.22,1986.02 3805.23,1972.01 3805.23,1953.22 3817.45,1941 3941.22,1941 3999.85,1882.37 4973.63,1882.37 5039.24,1816.76 SD_CARD.1@5441.62,1816.76
NetJ1_2: MCIMX6Y2DVM08AB.B2 SD_CARD.2 | length 1689.4
  USB 2.0 (90 Diff) DDR3 Data (50-100) w4: MCIMX6Y2DVM08AB.B2@3822.72,1986.02 3823.29,1985.44 3836,1985.44 3848.74,1972.7 3923.58,1972.7 4005.91,1890.37 4986.61,1890.37 5038.98,1838 5413.06,1838 5435.12,1860.06 SD_CARD.2@5441.62,1860.06
NetJ1_3: R50.2 SD_CARD.3 | length 67.8
  USB 2.0 (90 Diff) DDR3 Data (50-100) w4: R50.2@5375.64,1899 5437.25,1899 SD_CARD.3@5441.62,1903.37
NetJ1_8: MCIMX6Y2DVM08AB.C1 SD_CARD.8 | length 1717.4
  USB 2.0 (90 Diff) DDR3 Data (50-100) w4: MCIMX6Y2DVM08AB.C1@3854.21,2017.51 3918.97,2017.51 3968.13,1968.35 4017.88,1968.35 4064.12,1922.12 4937.63,1922.12 5145.74,2130.22 5431.3,2130.22 SD_CARD.8@5441.62,2119.91
NetJ7_1: LCD_RGB.1 Q1.3 | length 182.8
  USB 2.0 (90 Diff) DDR3 Data (50-100) w4: Q1.3@5613,542.31 5659.31,542.31 5724,607 5724,644.61 LCD_RGB.1@5722,646.61 5719.39,646.61 LCD_RGB.1@5718,648
NetJ7_2: LCD_RGB.2 R104.2 | length 103.5
  USB 2.0 (90 Diff) DDR3 Data (50-100) w4: R104.2@5619,667.53 5620.23,666.3 LCD_RGB.2@5722,666.3
NetJ7_5: LCD_RGB.5 R114.2 | length 3564.9
  USB 2.0 (90 Diff) DDR3 Data (50-100) w4: v1(3555,1280) 3555,1088 3907.34,735.66 5689.74,735.66 cw(c5689.76,731.66) 5692.41,734.66 ccw(c5696.41,739.13) 5696.41,733.13 5712.56,733.13 cw(c5712.56,729.13) 5715.39,731.96 LCD_RGB.5@5722,725.35
  Escapes, non-critical tracks, decoupling capacitor vias w4: v1(3555,1280) 3955,1280 4103.97,1428.97 4103.97,1845.66 4122.28,1863.98 R114.2@4122.28,1867
NetJ7_6: LCD_RGB.6 R115.2 | length 3014.3
  USB 2.0 (90 Diff) DDR3 Data (50-100) w4: 3575.17,1095.67 3915.49,755.35 5689.74,755.35 cw(c5689.76,751.35) 5692.44,754.32 ccw(c5696.41,758.82) 5696.41,752.82 5712.56,752.82 cw(c5712.56,748.82) 5715.39,751.65 LCD_RGB.6@5722,745.04 ; 3575.16,1095.68 cw(c3578,1098.5) 3574,1098.5 3574,1421.6 3605.24,1452.83 3605.24,1488.24 3629,1512 v1(3725,1512)
  Escapes, non-critical tracks, decoupling capacitor vias w4: R115.2@3724.05,1691 ccw(c3720.05,1690.87) 3722.9,1693.68 R115.2@3722.24,1694.34 3722.24,1516.93 3725,1514.16 v1(3725,1512)
NetJ7_7: LCD_RGB.7 R116.2 | length 3950.9
  USB 2.0 (90 Diff) DDR3 Data (50-100) w4: v1(3594,1325) 3594,1106.33 ccw(c3598,1106.33) 3595.16,1103.52 3923.65,775.03 5689.74,775.03 cw(c5689.76,771.03) 5692.42,774.02 ccw(c5696.41,778.5) 5696.41,772.5 5712.56,772.5 cw(c5712.56,768.5) 5715.39,771.33 LCD_RGB.7@5722,764.72
  Escapes, non-critical tracks, decoupling capacitor vias w4: R116.2@3098,2305 3098,2301.98 3070,2273.98 3070,2242.31 3023.69,2196 3023.69,1539.31 3238,1325 v1(3594,1325)
  Escapes, non-critical tracks, decoupling capacitor vias w15: R116.2@3098,2305 R116.2@3104.96,2305
NetJ7_8: LCD_RGB.8 R117.2 | length 3591.2
  USB 2.0 (90 Diff) DDR3 Data (50-100) w4: v1(3613,1309) 3613,1115.17 ccw(c3617,1115.17) 3614.16,1112.36 3931.8,794.72 5689.74,794.72 cw(c5689.76,790.72) 5692.42,793.7 ccw(c5696.41,798.19) 5696.41,792.19 5712.56,792.19 cw(c5712.56,788.19) 5715.39,791.02 LCD_RGB.8@5722,784.41
  Escapes, non-critical tracks, decoupling capacitor vias w4: v1(3613,1309) 3960.9,1309 4087.97,1436.07 4087.97,1885.47 4087.68,1885.76 4087.68,2003.12 4073.32,2017.47 4073.32,2038.03 R117.2@4062.36,2049
NetJ7_9: LCD_RGB.9 R118.2 | length 3439.7
  USB 2.0 (90 Diff) DDR3 Data (50-100) w4: v1(3634,1267) 3633.74,1266.74 3633.74,1120.62 3939.95,814.4 5689.74,814.4 cw(c5689.76,810.4) 5692.44,813.38 ccw(c5696.41,817.87) 5696.41,811.87 5712.56,811.87 cw(c5712.56,807.87) 5715.39,810.7 LCD_RGB.9@5722,804.09
  Escapes, non-critical tracks, decoupling capacitor vias w4: v1(3634,1267) 3953.31,1267 4112,1425.69 4112,1801 4150,1839 4150,1891.5 4117.4,1924.1 R118.2@4117.4,1927.12
NetJ7_10: LCD_RGB.10 R110.2 | length 3731.7
  USB 2.0 (90 Diff) DDR3 Data (50-100) w4: v1(3653,1355) 3653.43,1354.57 3653.43,1128.77 3948.11,834.09 5689.74,834.09 cw(c5689.76,830.09) 5692.42,833.07 ccw(c5696.41,837.56) 5696.41,831.56 5712.56,831.56 cw(c5712.56,827.56) 5715.39,830.39 LCD_RGB.10@5722,823.78
  Escapes, non-critical tracks, decoupling capacitor vias w4: R110.2@3100,2137 3100,2133.98 3040.24,2074.22 3040.24,1540.24 3225.49,1355 v1(3653,1355)
NetJ7_11: LCD_RGB.11 R111.2 | length 2749
  USB 2.0 (90 Diff) DDR3 Data (50-100) w4: v1@3674,1463.73 v1(3674,1462) 3674,1137.69 ccw(c3678,1137.69) 3675.16,1134.88 ; 3675.17,1134.86 3956.26,853.77 5689.74,853.77 cw(c5689.76,849.77) 5692.44,852.75 ccw(c5696.41,857.24) 5696.41,851.24 5712.56,851.24 cw(c5712.56,847.24) 5715.39,850.07 LCD_RGB.11@5722,843.46
  Escapes, non-critical tracks, decoupling capacitor vias w4: v1(3674,1462) 3664.24,1471.76 R111.2@3664.24,1692.34 3667.26,1692.34 R111.2@3678.21,1681.39
NetJ7_12: LCD_RGB.12 R119.2 | length 3441.4
  USB 2.0 (90 Diff) DDR3 Data (50-100) w4: 3693.97,1143.9 3693.97,1294.97 v1(3695,1296) ; 3693.99,1143.88 3964.42,873.46 5689.74,873.46 cw(c5689.76,869.46) 5692.42,872.44 ccw(c5696.41,876.93) 5696.41,870.93 5712.56,870.93 cw(c5712.56,866.93) 5715.39,869.76 LCD_RGB.12@5722,863.15
  Escapes, non-critical tracks, decoupling capacitor vias w4: v1(3695,1296) 3729,1296 3959.22,1296 4095.97,1432.75 4095.97,1888.79 4095.68,1889.08 4095.68,2075.66 4066.36,2104.98 R119.2@4066.36,2108
NetJ7_13: LCD_RGB.13 R120.2 | length 3635.9
  USB 2.0 (90 Diff) DDR3 Data (50-100) w4: v1(3712,1366) 3712.48,1154.88 ccw(c3716.48,1154.89) 3713.64,1152.07 3972.57,893.14 5689.74,893.14 cw(c5689.76,889.14) 5692.42,892.13 ccw(c5696.41,896.61) 5696.41,890.61 5712.56,890.61 cw(c5712.56,886.61) 5715.39,889.44 LCD_RGB.13@5722,882.83
  Escapes, non-critical tracks, decoupling capacitor vias w4: R120.2@3099.72,2084 3099.72,2080.98 3046.24,2027.51 3046.24,1542.73 3221.97,1367 3711,1367 v1(3712,1366)
NetJ7_14: LCD_RGB.14 R122.2 | length 2740.4
  USB 2.0 (90 Diff) DDR3 Data (50-100) w4: v1(3732,1451) 3732.17,1450.83 3732.17,1161.38 3980.72,912.83 5689.74,912.83 cw(c5689.76,908.83) 5692.44,911.8 ccw(c5696.41,916.3) 5696.41,910.3 5712.56,910.3 cw(c5712.56,906.3) 5715.39,909.13 LCD_RGB.14@5722,902.52
  Escapes, non-critical tracks, decoupling capacitor vias w4: R122.2@3608.26,1692.34 R122.2@3605.24,1692.34 3605.24,1479.76 3634,1451 v1(3732,1451)
NetJ7_15: LCD_RGB.15 R125.2 | length 3778.8
  USB 2.0 (90 Diff) DDR3 Data (50-100) w4: v1(3745,1342) 3745,1176.39 3988.88,932.51 5689.74,932.51 cw(c5689.76,928.51) 5692.42,931.5 ccw(c5696.41,935.98) 5696.41,929.98 5712.56,929.98 cw(c5712.56,925.98) 5715.39,928.81 LCD_RGB.15@5722,922.2
  Escapes, non-critical tracks, decoupling capacitor vias w4: R125.2@3097.72,2249 3097.72,2245.98 3031.69,2179.95 3031.69,1658.31 3032,1658 3032,1540 3230,1342 v1(3745,1342)
NetJ7_16: LCD_RGB.16 R112.2 | length 4541.7
  USB 2.0 (90 Diff) DDR3 Data (50-100) w4: v1(4442,1867) 4458,1867 4592,1733 4592,1357 4480,1245 4354.08,1245 4177.58,1421.51 4177.58,1430.57 3998.14,1610 3910.8,1610 3771.54,1470.74 3771.54,1177.69 3997.03,952.2 5689.74,952.2 cw(c5689.76,948.2) 5692.44,951.17 ccw(c5696.41,955.67) 5696.41,949.67 5712.56,949.67 cw(c5712.56,945.67) 5715.39,948.5 LCD_RGB.16@5722,941.89
  Escapes, non-critical tracks, decoupling capacitor vias w4: R112.2@4071.31,2168 R112.2@4064.36,2168 4064.36,2171.02 4075.32,2181.99 4094.19,2181.99 4102.19,2189.99 4134.98,2189.99 4442,1882.97 v1(4442,1867)
NetJ7_17: LCD_RGB.17 R127.2 | length 2797
  USB 2.0 (90 Diff) DDR3 Data (50-100) w4: v1(3791,1322) 3791.22,1321.78 3791.22,1185.85 4005.18,971.88 5689.74,971.88 cw(c5689.76,967.88) 5692.42,970.87 ccw(c5696.41,975.35) 5696.41,969.35 5712.56,969.35 cw(c5712.56,965.35) 5715.39,968.18 LCD_RGB.17@5722,961.57
  Escapes, non-critical tracks, decoupling capacitor vias w4: v1(3791,1322) 3962,1322 4019,1379 4019,1399 3946,1472 3909.72,1472 3896.24,1485.48 R127.2@3896.24,1692.98
NetJ7_18: LCD_RGB.18 R128.2 | length 3486.8
  USB 2.0 (90 Diff) DDR3 Data (50-100) w4: v1(3807,1343) 3806.59,1342.59 3806.59,1198.31 4013.34,991.57 5689.74,991.57 cw(c5689.76,987.57) 5692.42,990.55 ccw(c5696.41,995.04) 5696.41,989.04 5712.56,989.04 cw(c5712.56,985.04) 5715.39,987.87 LCD_RGB.18@5722,981.26
  Escapes, non-critical tracks, decoupling capacitor vias w4: R128.2@3109.95,2019.98 3109.95,2016.96 3084.99,1992 3052.24,1959.25 3052.24,1545.21 3218.48,1378.97 3348.29,1378.97 3771.03,1378.97 v1(3807,1343)
NetJ7_19: LCD_RGB.19 R113.2 | length 2733.8
  USB 2.0 (90 Diff) DDR3 Data (50-100) w4: v1(3832,1436) 3830.59,1434.59 3830.59,1202.15 4021.49,1011.25 5689.74,1011.25 cw(c5689.76,1007.25) 5692.44,1010.23 ccw(c5696.41,1014.72) 5696.41,1008.72 5712.56,1008.72 cw(c5712.56,1004.72) 5715.39,1007.55 LCD_RGB.19@5722,1000.94
  Escapes, non-critical tracks, decoupling capacitor vias w4: R113.2@3545.26,1692.34 R113.2@3542.24,1692.34 3542.24,1476.76 3583,1436 v1(3832,1436)
NetJ7_20: LCD_RGB.20 R129.2 | length 2860.5
  USB 2.0 (90 Diff) DDR3 Data (50-100) w4: v1(3994,1600) 3994,1568 3896,1470 3862,1470 3850.28,1458.28 3850.28,1210.31 4029.65,1030.94 5689.74,1030.94 cw(c5689.76,1026.94) 5692.42,1029.92 ccw(c5696.41,1034.41) 5696.41,1028.41 5712.56,1028.41 cw(c5712.56,1024.41) 5715.39,1027.24 LCD_RGB.20@5722,1020.63
  Escapes, non-critical tracks, decoupling capacitor vias w4: v1(3994,1600) 3994.22,1600.22 3994.22,1943.36 4010.85,1959.99 4036.44,1959.99 4060.21,1983.76 ccw(c4057.36,1986.57) 4061.36,1986.57 R129.2@4061.36,1992 R129.2@4068.31,1992
NetJ7_21: LCD_RGB.21 R102.2 | length 2414.3
  USB 2.0 (90 Diff) DDR3 Data (50-100) w4: v1(3870,1453) 3870,1220.08 ccw(c3874,1220.08) 3871.16,1217.26 4037.8,1050.62 5689.74,1050.62 cw(c5689.76,1046.62) 5692.44,1049.6 ccw(c5696.41,1054.09) 5696.41,1048.09 5712.56,1048.09 cw(c5712.56,1044.09) 5715.39,1046.92 LCD_RGB.21@5722,1040.31
  Escapes, non-critical tracks, decoupling capacitor vias w4: R102.2@3841.24,1693.98 3844.26,1693.98 3870,1668.24 v1(3870,1453)
NetJ7_22: LCD_RGB.22 R103.2 | length 3372.6
  USB 2.0 (90 Diff) DDR3 Data (50-100) w4: v1(3890,1355) 3890.79,1354.21 3890.79,1225.47 4045.95,1070.31 5689.74,1070.31 cw(c5689.76,1066.31) 5692.42,1069.29 ccw(c5696.41,1073.78) 5696.41,1067.78 5712.56,1067.78 cw(c5712.56,1063.78) 5715.39,1066.61 LCD_RGB.22@5722,1060
  Escapes, non-critical tracks, decoupling capacitor vias w4: R103.2@3111.24,1958.98 3111.24,1955.96 3058.24,1902.97 3058.24,1549.76 3220.83,1387.17 3774.14,1387.17 3806.31,1355 v1(3890,1355)
NetJ7_23: LCD_RGB.23 R105.2 | length 2741.6
  USB 2.0 (90 Diff) DDR3 Data (50-100) w4: v1(3909,1418) 3910.16,1416.84 3910.16,1233.94 4054.11,1089.99 5689.74,1089.99 cw(c5689.76,1085.99) 5692.42,1088.98 ccw(c5696.41,1093.46) 5696.41,1087.46 5712.56,1087.46 cw(c5712.56,1083.46) 5715.39,1086.29 LCD_RGB.23@5722,1079.68
  Escapes, non-critical tracks, decoupling capacitor vias w4: R105.2@3486.24,1691.34 3486.24,1468.76 3527,1428 3801.56,1428 3811.56,1418 v1(3909,1418) ; R105.2@3489.26,1691.34 R105.2@3500.22,1680.38
NetJ7_24: LCD_RGB.24 R106.2 | length 3467.3
  USB 2.0 (90 Diff) DDR3 Data (50-100) w4: v1(3928,1383) 3929.02,1381.98 3929.02,1242.92 4062.26,1109.68 5689.74,1109.68 cw(c5689.76,1105.68) 5692.44,1108.65 ccw(c5696.41,1113.15) 5696.41,1107.15 5712.56,1107.15 cw(c5712.56,1103.15) 5715.39,1105.98 LCD_RGB.24@5722,1099.37
  Escapes, non-critical tracks, decoupling capacitor vias w4: R106.2@3097.72,2190 3097.72,2186.98 3128.03,2156.66 3128.03,1976.8 3128.92,1975.91 3128.92,1628.97 3139.17,1618.71 3354.25,1403.63 3791.99,1403.63 3812.62,1383 v1(3928,1383)
NetJ7_25: LCD_RGB.25 R107.2 | length 2383.8
  USB 2.0 (90 Diff) DDR3 Data (50-100) w4: v1(3948,1425) 3948.7,1424.3 3948.7,1251.08 4070.41,1129.36 5689.74,1129.36 cw(c5689.76,1125.36) 5692.42,1128.35 ccw(c5696.41,1132.83) 5696.41,1126.83 5712.56,1126.83 cw(c5712.56,1122.83) 5715.39,1125.66 LCD_RGB.25@5722,1119.06
  Escapes, non-critical tracks, decoupling capacitor vias w4: R107.2@3780.24,1694.34 3783.26,1694.34 3794.22,1683.38 3794.22,1680.36 3851.46,1623.12 3851.46,1450.54 3867,1435 3938,1435 v1(3948,1425)
NetJ7_26: LCD_RGB.26 R108.2 | length 3259.1
  USB 2.0 (90 Diff) DDR3 Data (50-100) w4: v1(3969,1369) 3969,1259.23 ccw(c3973,1259.23) 3970.16,1256.41 4078.26,1148.31 5690.68,1148.31 cw(c5690.7,1144.31) 5692.98,1147.59 ccw(c5696.41,1152.52) 5696.41,1146.52 5712.56,1146.52 cw(c5712.56,1142.52) 5715.39,1145.35 LCD_RGB.26@5722,1138.74
  Escapes, non-critical tracks, decoupling capacitor vias w4: R108.2@3111.95,1897.98 3111.95,1894.96 3064.24,1847.25 3064.24,1552.24 3220.86,1395.63 3782.68,1395.63 3809.31,1369 v1(3969,1369)
NetJ7_27: LCD_RGB.27 R109.2 | length 2735.3
  USB 2.0 (90 Diff) DDR3 Data (50-100) w4: v1(3988,1404) 3988.07,1403.93 3988.07,1267.38 4086.72,1168.73 5689.74,1168.73 cw(c5689.76,1164.73) 5692.42,1167.72 ccw(c5696.41,1172.2) 5696.41,1166.2 5712.56,1166.2 cw(c5712.56,1162.2) 5715.39,1165.03 LCD_RGB.27@5722,1158.43
  Escapes, non-critical tracks, decoupling capacitor vias w4: R109.2@3426.26,1690.34 R109.2@3423.24,1690.34 3423.24,1461.76 3465,1420 3798.25,1420 3814.12,1404.12 v1@3988,1404.12
NetJ7_28: LCD_RGB.28 R130.2 | length 2775.3
  USB 2.0 (90 Diff) DDR3 Data (50-100) w4: v1(4005.85,1385.94) 4005.85,1277.45 4094.88,1188.42 5689.74,1188.42 cw(c5689.76,1184.42) 5692.42,1187.4 ccw(c5696.41,1191.89) 5696.41,1185.89 5712.56,1185.89 cw(c5712.56,1181.89) 5715.39,1184.72 LCD_RGB.28@5722,1178.11
  Escapes, non-critical tracks, decoupling capacitor vias w4: R130.2@3366.26,1691.7 R130.2@3363.24,1691.7 3363.24,1456.39 3408,1411.63 3795.3,1411.63 3811.93,1395 3956,1395 3965.06,1385.94 v1(4005.85,1385.94)
NetJ7_30: LCD_RGB.30 R121.2 | length 3499.2
  USB 2.0 (90 Diff) DDR3 Data (50-100) w4: R121.2@3739.36,2726.9 3742.38,2726.9 3753.35,2737.87 3753.35,2755.35 3763,2765 5035.5,2765 cw(c5035.5,2761) 5038.36,2763.8 5567.44,2234.72 cw(c5564.63,2231.87) 5568.63,2231.87 5568.63,1708.29 cw(c5564.63,1708.29) 5567.46,1705.46 5336,1474 5336,1343 5451.21,1227.79 5689.74,1227.79 cw(c5689.76,1223.79) 5692.42,1226.77 ccw(c5696.41,1231.26) 5696.41,1225.26 5712.56,1225.26 cw(c5712.56,1221.26) 5715.39,1224.09 LCD_RGB.30@5722,1217.48
NetJ7_31: LCD_RGB.31 R200.2 | length 3860.6
  USB 2.0 (90 Diff) DDR3 Data (50-100) w4: R200.2@3444,2730.28 3472.72,2730.28 3504.03,2698.97 3601.37,2698.97 3601.96,2698.37 3692.81,2698.37 3693.6,2697.59 3715.03,2697.59 3717.38,2699.93 3717.38,2742.35 3732.5,2757.48 3732.5,2771.5 3757,2796 3795.69,2796 3807,2784.69 5043.66,2784.68 cw(c5043.66,2780.68) 5046.51,2783.49 5587.16,2242.84 cw(c5584.31,2240.03) 5588.31,2240.03 5588.31,1700.13 cw(c5584.31,1700.13) 5587.14,1697.3 5355.69,1465.85 5355.69,1351.15 5459.37,1247.47 5689.74,1247.47 cw(c5689.76,1243.47) 5692.44,1246.45 ccw(c5696.41,1250.94) 5696.41,1244.94 5712.56,1244.94 cw(c5712.56,1240.94) 5715.39,1243.77 LCD_RGB.31@5722,1237.17
NetJ7_32: LCD_RGB.32 R123.2 | length 3783.1
  USB 2.0 (90 Diff) DDR3 Data (50-100) w4: R123.2@3513,2729.28 3516.02,2729.28 3540.34,2704.97 3603.85,2704.97 3604.45,2704.37 3695.3,2704.37 3696.08,2703.59 3707.03,2703.59 3709.38,2705.93 3709.38,2745.67 3724.5,2760.79 3724.5,2774.81 3726.08,2776.4 3726.08,2776.92 3753.53,2804.37 5051.81,2804.37 5608,2248.18 5608,1691.98 cw(c5604,1691.98) 5606.83,1689.15 5375.37,1457.69 5375.37,1359.31 5467.52,1267.16 5689.74,1267.16 cw(c5689.76,1263.16) 5692.42,1266.14 ccw(c5696.41,1270.63) 5696.41,1264.63 5712.56,1264.63 cw(c5712.56,1260.63) 5715.39,1263.46 LCD_RGB.32@5722,1256.85
NetJ7_33: LCD_RGB.33 R124.2 | length 3702
  USB 2.0 (90 Diff) DDR3 Data (50-100) w4: R124.2@3586,2728.28 3589.02,2728.28 3606.93,2710.37 3684.02,2710.37 3701.38,2727.73 3701.38,2763.53 3723.85,2786 3750.22,2812.37 3790.32,2812.37 3802,2824.06 5059.97,2824.06 cw(c5059.97,2820.05) 5062.82,2822.86 5626.5,2259.18 cw(c5623.68,2256.34) 5627.68,2256.34 5627.69,1683.83 cw(c5623.69,1683.83) 5626.51,1681 5395.06,1449.54 5395.06,1367.46 5475.67,1286.84 5689.74,1286.84 cw(c5689.76,1282.84) 5692.42,1285.83 ccw(c5696.41,1290.31) 5696.41,1284.31 5712.56,1284.31 cw(c5712.56,1280.31) 5715.39,1283.14 LCD_RGB.33@5722,1276.54
NetJ7_34: LCD_RGB.34 R126.2 | length 3604.8
  USB 2.0 (90 Diff) DDR3 Data (50-100) w4: R126.2@3662.36,2727.9 3665.38,2727.9 3682.29,2744.81 3682.63,2744.81 3682.63,2756.09 3746.91,2820.37 3786.63,2820.37 3810,2843.74 5068.12,2843.74 cw(c5068.12,2839.74) 5070.92,2842.59 5646.21,2267.3 cw(c5643.37,2264.49) 5647.37,2264.52 5647.37,1675.67 cw(c5643.37,1675.67) 5646.2,1672.84 5414.74,1441.38 5414.74,1375.62 5483.83,1306.53 5689.74,1306.53 cw(c5689.76,1302.53) 5692.44,1305.5 ccw(c5696.41,1310) 5696.41,1304 5712.56,1304 cw(c5712.56,1300) 5715.39,1302.83 LCD_RGB.34@5722,1296.22
NetJ14_5: CSI_FPC.5 R174.1 | length 144.7
  USB 2.0 (90 Diff) DDR3 Data (50-100) w4: R174.1@3285,317 3288.02,317 3309.27,295.75 3335.25,295.75 3376,255 CSI_FPC.5@3376,227
NetJ14_6: CSI_FPC.6 MCIMX6Y2DVM08AB.M17 | length 2256.4
  USB 2.0 (90 Diff) DDR3 Data (50-100) w4: v1(3321.53,2279.47) 3321.06,2279 3289.63,2279 3287.28,2281.34 3287.28,2292.28 3295.98,2300.98 MCIMX6Y2DVM08AB.M17@3350.28,2300.98 ; v1(3371,278) 3395.69,253.32 CSI_FPC.6@3395.69,227
  Int6 eMMC High-Speed Data Lines (8-bit bus), SDIO/peripherals w4: v1(3321.53,2279.47) 3321.53,2278.53 3249.94,2206.94 ccw(c3252.76,2204.11) 3248.76,2204.13 3240.25,1558.21 ccw(c3258.19,1558.02) 3240.25,1557.94 3248.62,412 3370.62,290 3370.62,278.38 v1(3371,278)
NetJ14_8: CSI_FPC.8 MCIMX6Y2DVM08AB.M16 | length 2213
  USB 2.0 (90 Diff) DDR3 Data (50-100) w4: v1(3363.77,2287.23) 3365.3,2288.76 3369.56,2288.76 MCIMX6Y2DVM08AB.M16@3381.77,2300.98 ; v1(3412,274) 3435.06,250.94 CSI_FPC.8@3435.06,227
  Int6 eMMC High-Speed Data Lines (8-bit bus), SDIO/peripherals w4: v1(3363.77,2287.23) 3346.26,2287.23 3257.94,2198.91 ccw(c3260.78,2196.09) 3256.78,2196.09 3256.76,2138.99 3256.76,1627.3 3248.32,1559.2 ccw(c3258.19,1558.02) 3248.33,1556.8 3256.76,1488.43 3256.78,430.88 ccw(c3260.78,430.88) 3257.93,428.07 v1(3412,274)
NetL1_1: L1.1 U8.7 | length 248.3
  USB 2.0 (90 Diff) DDR3 Data (50-100) w4: L1.1@739.45,870.55 875.45,870.55 893.22,852.78 893.22,832.78 855.43,795 U8.7@841.65,795
NetL1_4: L1.4 U8.6 | length 129.1
  USB 2.0 (90 Diff) DDR3 Data (50-100) w4: L1.4@739.45,780 742.4,780 807.4,845 U8.6@841.65,845
NetL2_1: L2.1 U9.7 | length 290
  USB 2.0 (90 Diff) DDR3 Data (50-100) w4: L2.1@586.72,1371.72 586.72,1305.28 616,1276 746.22,1276 773.22,1249 U9.7@787,1249
NetL2_4: L2.4 U9.6 | length 141.6
  USB 2.0 (90 Diff) DDR3 Data (50-100) w4: L2.4@677.28,1371.72 677.28,1368.77 708.74,1337.31 711.69,1337.31 750,1299 U9.6@787,1299
NetP1_5: JTAG.5 MCIMX6Y2DVM08AB.N16 R132.2 | length 3065.5
  USB 2.0 (90 Diff) DDR3 Data (50-100) w4: MCIMX6Y2DVM08AB.N16@3381.77,2332.47 3384.63,2332.47 3389.63,2337.47 3393.47,2337.47 v1(3395,2339) ; v1(5479,3169) 5547.47,3169 R132.2@5548,3168.47 5552.17,3164.3 JTAG.5@5730.09,3164.3
  Int6 eMMC High-Speed Data Lines (8-bit bus), SDIO/peripherals w4: v1(3395,2339) 3369,2339 3326.65,2381.34 3326.65,2775.97 3465.69,2915 5002,2915 5003,2914 5224,2914 v1(5479,3169)
NetP1_7: JTAG.7 MCIMX6Y2DVM08AB.P14 R131.2 | length 3435.4
  USB 2.0 (90 Diff) DDR3 Data (50-100) w4: v1(3430.45,2351.05) 3431.15,2351.05 3442.63,2362.54 3442.63,2363.97 MCIMX6Y2DVM08AB.P14@3444.76,2363.97 ; v1(5479,3088) 5548.53,3088 R131.2@5549,3087.53 5700.29,3087.53 5723.52,3064.3 JTAG.7@5730.09,3064.3
  Int6 eMMC High-Speed Data Lines (8-bit bus), SDIO/peripherals w4: v1(3430.45,2351.05) 3430.45,2403.38 3399.52,2434.31 3399.52,2599.4 3427,2626.89 3427,2836.72 3476.28,2886 5202,2886 5237.77,2886 5356.71,2767.06 5356.71,2764.32 5475.03,2646 5495,2646 5502.38,2653.38 5502.38,3064.62 v1(5479,3088)
NetP1_9: JTAG.9 R134.2 | length 218.3
  USB 2.0 (90 Diff) DDR3 Data (50-100) w4: R134.2@5552,2867.28 5633.07,2867.28 JTAG.9@5730.09,2964.3
NetP1_13: JTAG.13 MCIMX6Y2DVM08AB.N15 | length 3057.8
  USB 2.0 (90 Diff) DDR3 Data (50-100) w4: MCIMX6Y2DVM08AB.N15@3413.27,2332.47 3415.4,2332.47 3415.4,2331.77 3426.23,2320.95 3431.88,2320.95 v1(3433.41,2319.41) ; v1(5480,2658) 5623.79,2658 JTAG.13@5730.09,2764.3
  Int6 eMMC High-Speed Data Lines (8-bit bus), SDIO/peripherals w4: v1(3433.41,2319.41) 3424.86,2327.97 3422.03,2327.97 3415,2335 3415,2410.34 3393.52,2431.83 3393.52,2529.42 3392.74,2530.2 3392.74,2817.74 3415,2840 3415,2841.69 3471.31,2898 5240,2898 v1(5480,2658)
NetP1_15: JTAG.15 MCIMX6Y2DVM08AB.N14 R133.2 | length 3016.7
  USB 2.0 (90 Diff) DDR3 Data (50-100) w4: MCIMX6Y2DVM08AB.N14@3444.76,2332.47 3445.15,2332.47 3461.62,2316 v1(3462,2316) ; v1(5480,2619) 5549.47,2619 R133.2@5550,2619.53 5685.32,2619.53 JTAG.15@5730.09,2664.3
  Int6 eMMC High-Speed Data Lines (8-bit bus), SDIO/peripherals w4: v1(3462,2316) 3444.76,2333.24 3444.76,2397.55 3405.52,2436.8 3405.52,2587.72 3435,2617.2 3435,2833.4 3479.6,2878 4947,2878 5206,2619 v1(5480,2619)
NetP2_1: BOOT_MODE_0.1 VDD_SNVS.2@1958.86,2718.17 | length 100
  USB 2.0 (90 Diff) DDR3 Data (50-100) w4: BOOT_MODE_0.1@1958.86,2618.17 VDD_SNVS.2@1958.86,2718.17
NetP2_2: BOOT_MODE_0.2 MCIMX6Y2DVM08AB.T10 | length 2140.1
  USB 2.0 (90 Diff) DDR3 Data (50-100) w4: v1(3185,2643) 3225.76,2602.24 3506.76,2602.24 3530,2579 3530,2541.27 3565.17,2506.1 3565.17,2472.26 3559.46,2466.55 3559.46,2452.12 3570.75,2440.83 MCIMX6Y2DVM08AB.T10@3570.75,2426.96
  Int6 eMMC High-Speed Data Lines (8-bit bus), SDIO/peripherals w4: v1(3110,2436) 3110,2568 v1(3185,2643)
  Escapes, non-critical tracks, decoupling capacitor vias w4: BOOT_MODE_0.2@1858.86,2618.17 1864.88,2624.19 1895.37,2624.19 1925.86,2654.68 2032.71,2654.68 2251.39,2436 v1(3110,2436)
NetP2_3: BOOT_MODE_0.3 GND.2@1769.33,2718.17 | length 104.3
  USB 2.0 (90 Diff) DDR3 Data (50-100) w4: BOOT_MODE_0.3@1758.86,2618.17 1758.86,2707.69 GND.2@1769.33,2718.17
NetP3_1: BOOT_MODE_1.1 VDD_SNVS.2@2308.91,2724.17 | length 109.5
  USB 2.0 (90 Diff) DDR3 Data (50-100) w4: VDD_SNVS.2@2308.91,2724.17 2308.91,2630.11 BOOT_MODE_1.1@2319.86,2619.17
NetP3_2: BOOT_MODE_1.2 MCIMX6Y2DVM08AB.U10 | length 1755.1
  USB 2.0 (90 Diff) DDR3 Data (50-100) w4: v1(3170,2659) 3407,2659 3423.21,2642.79 3496.55,2642.79 3510.48,2628.86 3510.48,2614.19 3530.88,2593.79 3558.56,2593.79 3578.96,2573.38 3578.96,2469.03 3570.75,2460.82 MCIMX6Y2DVM08AB.U10@3570.75,2458.46
  Int6 eMMC High-Speed Data Lines (8-bit bus), SDIO/peripherals w4: v1(3090,2449) 3090,2579 v1(3170,2659)
  Escapes, non-critical tracks, decoupling capacitor vias w4: BOOT_MODE_1.2@2219.86,2619.17 2390.02,2449 v1(3090,2449)
NetP3_3: BOOT_MODE_1.3 GND.2@2120.33,2724.17 | length 105.2
  USB 2.0 (90 Diff) DDR3 Data (50-100) w4: BOOT_MODE_1.3@2119.86,2619.17 2119.86,2723.69 GND.2@2120.33,2724.17
NetQ1_1: Q1.1 R101.2 | length 86.5
  USB 2.0 (90 Diff) DDR3 Data (50-100) w4: R101.2@5493,469.97 5507.28,455.69 Q1.1@5573.63,455.69
NetR5_2: MCIMX6Y2DVM08AB.C10 R5.2 R118.1 | length 1310.1
  USB 2.0 (90 Diff) DDR3 Data (50-100) w4: v1(3554.07,2001.93) 3554.62,2001.93 3570.2,2017.51 MCIMX6Y2DVM08AB.C10@3570.75,2017.51
  Escapes, non-critical tracks, decoupling capacitor vias w4: v1(3554.07,2001.93) 3556.24,2001.93 3561.16,1997 3565.6,1997 3581.6,1981 3590.97,1981 3603.08,1968.9 3603.08,1967.95 3617.03,1954 3737.51,1954 3762.53,1928.98 R5.2@3964.71,1928.98 3964.71,1931.57 3978.46,1917.82 3978.46,1896.93 3986.22,1889.17 3986.22,1711.57 3955,1680.35 3955,1570.28 3975.64,1549.64 4003.36,1549.64 4003.5,1549.5 4045.28,1591.28 4045.28,1880.71 4064.12,1899.56 R118.1@4064.12,1927.12
NetR6_2: MCIMX6Y2DVM08AB.B9 R6.2 R114.1 | length 1191.2
  USB 2.0 (90 Diff) DDR3 Data (50-100) w4: v1(3585.61,1969.39) MCIMX6Y2DVM08AB.B9@3602.24,1986.02
  Escapes, non-critical tracks, decoupling capacitor vias w4: v1(3585.61,1969.39) 3584.47,1968.26 3584.47,1959.87 3579.29,1954.69 3617.97,1916 3915.47,1916 R6.2@3964.47,1867 3964.47,1716.87 3947,1699.4 3947,1566.96 3972.46,1541.5 4006.81,1541.5 4064,1598.69 4064,1862 R114.1@4069,1867
NetR7_2: MCIMX6Y2DVM08AB.P15 R7.2 | length 157.7
  USB 2.0 (90 Diff) DDR3 Data (50-100) w4: R7.2@3266,2389 3266,2388.81 3275.81,2379 3335.59,2379 3337.33,2377.26 3399.98,2377.26 MCIMX6Y2DVM08AB.P15@3413.27,2363.97
NetR8_2: MCIMX6Y2DVM08AB.A9 R8.2 R115.1 | length 314.8
  USB 2.0 (90 Diff) DDR3 Data (50-100) w4: MCIMX6Y2DVM08AB.A9@3602.24,1954.52 3602.24,1937.95 3632.19,1908 3669,1908 3679.01,1897.99 3692.79,1897.99 v1(3709.85,1880.92)
  Escapes, non-critical tracks, decoupling capacitor vias w4: v1(3709.85,1880.92) 3709.85,1863.26 3709.77,1863.19 3707.56,1863.19 R8.2@3721.24,1849.51 3717.3,1849.51 3703.55,1835.76 3703.55,1831.83 3695.55,1823.83 3695.55,1771.29 3719.22,1747.63 R115.1@3722.24,1747.63
NetR9_2: MCIMX6Y2DVM08AB.E10 R9.2 R116.1 | length 749
  USB 2.0 (90 Diff) DDR3 Data (50-100) w4: MCIMX6Y2DVM08AB.E10@3570.75,2080.5 v1(3586,2096)
  DDR3 Fly-by Routing (Address, Command, Control), QSPI Flash (Clk, IO) w4: v1(3160,2343) 3175,2358 v1(3264,2358)
  Escapes, non-critical tracks, decoupling capacitor vias w4: R116.1@3151.28,2305 3160,2313.72 v1(3160,2343) ; v1(3264,2358) 3264,2318.59 3322.51,2260.08 3322.51,2095.86 3337.87,2080.5 3498.46,2080.5 3513.87,2065.1 3555.1,2065.1 v1(3586,2096)